# Altium PCB ESP32 PCB V1.PcbDoc (part 3 of 3)
Units mil, origin at the board's own origin, x right, y up, seen from the top; angles counter-clockwise.
Board outline 2800 x 1000 mil, 4 copper layers (L1, L2, L3, L4), stack 61.583 mil thick; 64 components, 73 nets, 299 pads, 159 vias.
Unrouted connection lines stored in the file: 3.
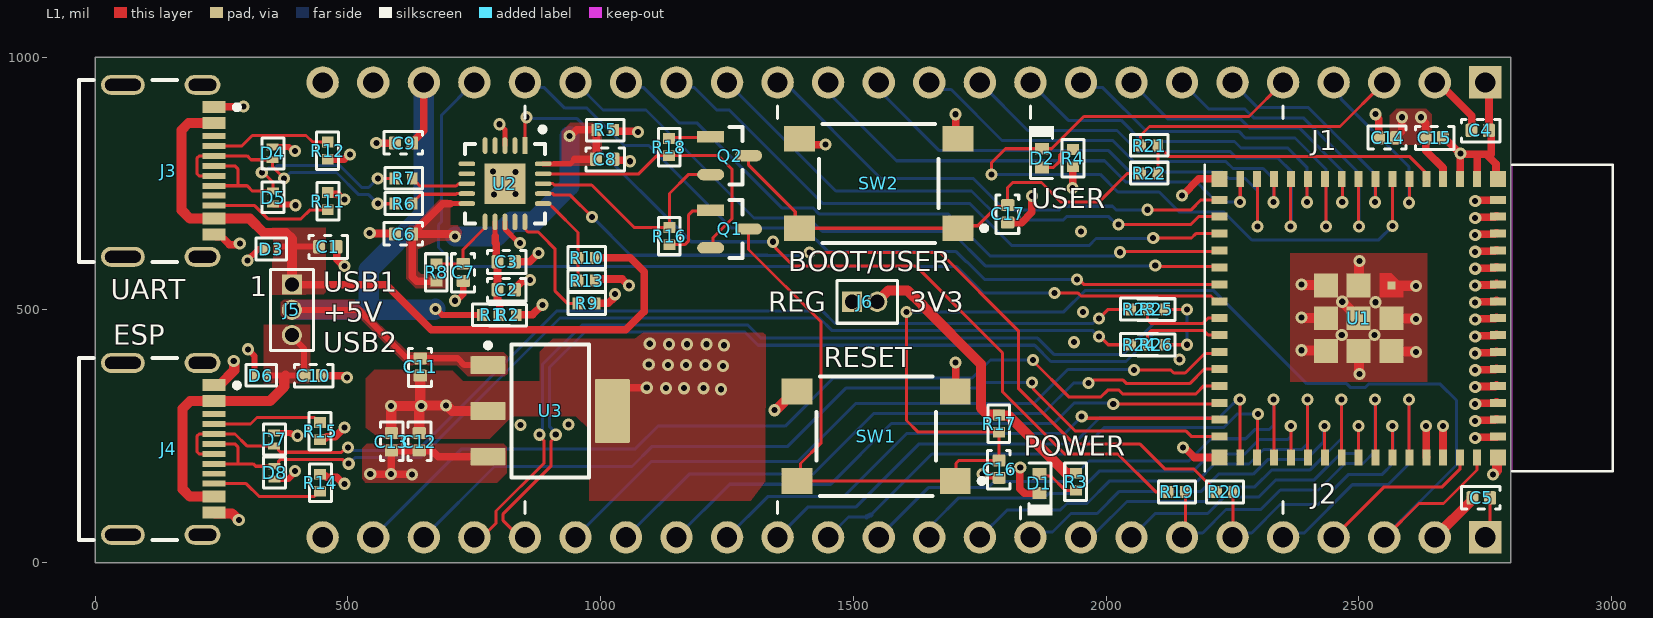
[diagram p0: L1 view]

## Via types
v1: diameter 24, hole 12, L1 to L4, tented both sides, 159 vias

## Nets (pads, with @x,y where several pads share a name; then routed paths per layer and width w, separated by ;. In a path a pad name is that pad's centre, name@x,y a point inside that pad or via, vN(x,y) a via of type N, cw(c..) or ccw(c..) an arc to the next point about the centre after c; other vN are vias at no path point) (continued)
GND: (continued)
  L1 w15: J3.B1A12 239.15,644.7 249.98,644.7 265.68,629 281.56,629 283.56,631 v1(286,631) ; J3.A1B12 249.47,900.98 249.98,901.49 292.49,901.49 v1(293,902) ; R14.1 448.13,171.87 455.34,171.87 458.1,169.11 477.4,169.11 490.63,155.88 v1(493.06,155.88) ; R15.1 448.13,246.12 455.34,246.12 458.1,248.88 474.88,248.88 v1(493,267) ; C10.1 491.56,370 495.56,366 v1(498,366) ; R11.1 463.13,728.88 479.71,728.88 490.59,718 v1(493,718) ; R12.1 492.56,797.99 501.56,807 v1(504,807) ; C1.1 477.58,624.62 477.58,600.29 490.87,587 v1(493,587) ; v1(543,652) 544,651 591.8,651 C6.1 ; v1(556,830) C9.1 ; C2.1 830.2,541.38 845.95,557.12 858.58,557.12 v1(860.3,558.84) ; C3.1 859.31,595 v1(877.16,612.84) ; R9.1 1015.06,513 1026.28,524.22 1026.28,529.28 v1(1028,531) ; R13.1@989.54,558.53 992.04,561.03 1042.47,561.03 1055.5,548 v1(1056.29,548) ; U3.4 1023.03,319.05 1049.98,346 v1(1091,346) ; C8.1 1027.28,795.72 1056.09,795.72 v1(1057.82,794) ; SW2.4 1405.09,827 v1(1445,827) ; SW1.3 1702,339.09 v1(1702,396) ; v1@1702,877 1702,843.08 SW2.3 ; v1(1755,175.2) 1757.44,175.2 1760.53,172.11 1783.69,172.11 C16.1 ; C17.1 1832.8,672.8 1853,693 v1(1853,725) ; v1(1830,188) 1829,187 1829,145.79 1837.79,137 D1.1@1864.4,137 ; v1(2150,726) 2183.06,759.06 U1.63 ; v1(2151.84,228) 2154.28,228 2174.34,207.94 U1.64 U1.64 ; v1(2533.09,887.09) 2533.09,884.66 2539.3,878.45 C14.1 ; v1@2632.49,264.56 2632.89,264.16 2632.89,209.06 U1.42@2633.64,208.31 ; C15.1@2665.91,838.93 C15.1 ; C15.1@2665.91,843.93 2700.84,809 v1(2701,809) ; v1@2665.96,264.56 2666.36,264.16 2666.36,209.06 U1.43@2667.11,208.31 ; U1.2 2700.57,759.43 2700.57,808.57 v1(2701,809) ; v1(2730,246.75) 2731.23,247.98 2773.77,247.98 U1.46 ; v1(2730,280.21) 2731.23,281.44 2769.16,281.44 U1.47@2772.13,284.41 ; v1(2730,313.68) 2731.23,314.91 2769.16,314.91 U1.48@2772.13,317.87 ; v1(2730,347.14) 2731.23,348.37 2769.16,348.37 U1.49@2772.13,351.34 ; v1(2730,380.61) 2731.23,381.84 2769.16,381.84 U1.50@2772.13,384.8 ; v1(2730,414.07) 2731.23,415.3 2769.16,415.3 U1.51@2772.13,418.27 ; v1(2730,447.54) 2731.23,448.77 2769.16,448.77 U1.52@2772.13,451.73 ; v1(2730,481) 2731.23,482.23 2769.16,482.23 U1.53@2772.13,485.2 ; v1(2730,514.46) 2731.23,515.7 2769.16,515.7 U1.54@2772.13,518.66 ; v1(2730,547.93) 2731.23,549.16 2769.16,549.16 U1.55@2772.13,552.13 ; v1(2730,581.39) 2731.23,582.63 2769.16,582.63 U1.56@2772.13,585.59 ; v1(2730,614.86) 2731.23,616.09 2769.16,616.09 U1.57@2772.13,619.06 ; v1(2730,648.32) 2731.23,649.56 2769.16,649.56 U1.58@2772.13,652.52 ; v1(2730,681.79) 2731.23,683.02 2769.16,683.02 U1.59@2772.13,685.98 ; v1(2730,715.25) 2731.23,716.48 U1.60@2769.16,716.48 ; U1.1@2733.76,759.15 2733.76,807.6 ; J1.1 2757.2,942.8 C4.1 2761.52,850.69 2761.52,807.55 2761.47,807.6 2752.07,807.6 ; U1.62@2775.1,759.15 2771.15,763.1 2771.15,788.52 2752.07,807.6 ; v1(2701,809) 2702.4,807.6 2733.76,807.6 ; 2733.76,807.6 2752.07,807.6
  L1 w20: J4.B1A12 236.65,97.2 270.8,97.2 v1(284,84) ; J4.A1B12 245.67,350.98 275,380.32 v1@275,390 ; C13.1 585.5,256.7 585.5,309.5 v1(585,310) v1(645,310) ; C12.1 641,304.92 645,308.92 v1(645,310) ; C11.1 643,313.08 645,311.08 v1(645,310) ; U3.2 706.08,300 695.08,311 v1(694,311) 693.5,310.5 645.5,310.5 v1(645,310) ; v1(1343.54,301.46) 1344.3,302.23 1347.23,302.23 1383.58,338.58 SW1.4 ; v1(2386,550) 2386.77,549.23 2433.64,549.23 U1.71 U1.71@2434.87,548 ; v1@2386.77,419.31 U1.73@2433.64,419.31 ; v1@2386.77,484.27 2433.64,484.27 U1.72 ; v1(2467,516) 2467,515.87 U1.61 ; U1.70@2498.6,417.69 2500.22,416.08 2500.22,373.91 v1(2500.98,373.14) ; U1.69@2500.22,549.23 v1@2500.22,596.11 ; U1.68@2565.18,417.69 v1@2612.05,417.69 ; U1.67@2565.18,482.66 v1@2612.05,482.66 ; U1.66@2565.18,547.62 v1@2612.05,547.62 ; J2.2 2722.98,122.98 2722.98,128.19 C5.1@2724.8,130 ; v1(2765,174) 2773,182 2773,205.87 U1.65
  other v1: 395,181 400,251 2632.49,270 2665.96,270 841,272 936,273 1238,343 1129,345 1165,345 1203,345 1242,389 1133,391 1169,391 1207,391 1095,392 274,399 2145,402 2612.82,416.93 2386,420.08 1244,430 1135,432 1171,432 1209,432 1097,433 1936,436 2466,450 2531,450 2612.82,481.89 2386,485.04 1954,496 2533,515 2612.82,546.85 2500.98,596.87 1950,655 789,728 831,729 831,773 787,774 1702,887
GPIO0: R21.2 R22.2 U1.4 | length 620.9
  L1 w6: R22.2 R21.2 2102.01,823.82 2107.64,818.19 2109.31,818.19 2124.49,803.01 2600.69,803.01 2630.39,773.3 2630.39,761.93 U1.4
GPIO1: J1.4 U1.5 | length 344
  L1 w6: v1@2599.8,714.8 U1.5
  L4 w6: J1.4 2450,935.39 2464.23,921.15 2464.23,917.77 2599,783 v1(2599,712)
GPIO2: D2.1 J1.5 U1.6 | length 1624.3
  L1 w6: v1@1773,761.6 v1(1773,768) 1773,791 1800.7,818.7 D2.1 1891.97,818.7 1955.86,882.59 2282.59,882.59 J1.5 ; v1(2566.34,665.59) U1.6
  L4 w6: v1(1773,768) 1988,768 2023,733 2104.82,733 2144.38,693.44 2232.59,693.44 2288.03,638 2511.18,638 2511.76,638.57 2539.32,638.57 v1(2566.34,665.59)
GPIO3: J1.6 U1.7 | length 458.8
  L1 w6: v1(2532,713) 2532.44,713.44 2532.44,758.62 U1.7
  L4 w6: J1.6 2300,900 2400,900 2532,768 v1(2532,713)
GPIO4: J1.7 U1.8 | length 623.9
  L1 w6: U1.8 2499.41,665.59 v1(2500,665)
  L4 w6: J1.7 2202.64,897.36 2274.36,897.36 2291.72,880 2390,880 2500,770 v1(2500,665)
GPIO5: J1.8 U1.9 | length 596.5
  L1 w6: v1@2467.44,713.44 U1.9@2467.44,758.62
  L4 w6: J1.8 2122.64,877.36 2266.07,877.36 2283.43,860 2381.72,860 2467,774.72 v1(2467,713)
GPIO6: J1.9 U1.10 | length 763
  L1 w6: v1@2434.41,665.59 U1.10@2434.41,759.06
  L4 w6: J1.9 1960.33,939.67 1993.33,939.67 2079.87,853.13 2262.02,853.13 2275.15,840 2373.43,840 2435,778.43 v1(2435,665)
GPIO7: J1.10 U1.11 | length 730.9
  L1 w6: v1@2397.44,713.44 U1.11@2397.44,758.62
  L4 w6: J1.10 1925,875 2029.72,875 2071.59,833.13 2253.74,833.13 2266.86,820 2359.29,820 2397,782.29 v1(2397,713)
GPIO8: J1.11 U1.12 | length 892.6
  L1 w6: v1(2365,665) U1.12@2365,758.5
  L4 w6: J1.11 1845,855 2021.43,855 2063.31,813.13 2245.45,813.13 2258.58,800 2340,800 2366.93,773.07 2366.93,666.93 v1(2365,665)
GPIO9: J1.12 U1.13 | length 851.4
  L1 w6: v1@2331.65,713.44 U1.13@2331.65,758.62
  L4 w6: J1.12 1664.61,950 1678.85,935.77 1693.23,935.77 1794,835 2013.15,835 2055.02,793.13 2237.17,793.13 2250.8,779.49 2310.51,779.49 2331.21,758.79 v1(2331.21,713)
GPIO10: J1.13 U1.14 | length 1011
  L1 w6: v1(2299.21,665) U1.14@2299.21,758.46
  L4 w6: J1.13 1550,935.39 1565.73,919.65 1565.73,919.27 1670,815 2004.86,815 2046.74,773.13 2228.88,773.13 2242.52,759.49 2275.51,759.49 2299.21,735.79 v1(2299.21,665)
GPIO11: J1.14 U1.15 | length 969.7
  L1 w6: v1@2265.16,713.87 U1.15
  L4 w6: J1.14 1460.33,939.67 1460.33,919.67 1585,795 1996.58,795 2038.58,753 2179,753 2190,742 2190,741.82 2218.38,713.44 v1(2264.72,713.44)
GPIO12: J1.15 U1.16 | length 992.2
  L1 w6: v1(2082,698) 2168,698 2187.72,717.72 U1.16
  L4 w6: J1.15 1364,950 1554,760 1737,760 1799,698 1907.09,698 1914.09,705 2012.5,705 2019.5,698 v1(2082,698)
GPIO13: J1.16 U1.17 | length 1102.3
  L1 w6: v1(2024,669) 2167.28,669 2182.54,684.25 U1.17
  L4 w6: J1.16 1465,735 1733.72,735 1790.72,678 1915.37,678 1922.37,685 2004.21,685 2020.21,669 v1(2024,669)
GPIO14: J1.17 U1.18 | length 1217.5
  L1 w6: v1(2093,642) 2168.57,642 2177.36,650.79 U1.18
  L4 w6: J1.17 1160.33,939.67 1185.33,939.67 1230,895 1254.86,895 1439.86,710 1730.43,710 1813.43,627 1966,627 1980,641 2092,641 v1(2093,642)
GPIO15: J1.18 U1.19 | length 1320.2
  L1 w6: v1(2027,614) 2028,615 2221.5,615 U1.19
  L4 w6: J1.18 1060.33,939.67 1085.33,939.67 1155,870 1190,870 1358.24,701.76 1419.82,701.76 1431.58,690 1687,690 1770,607 2016.21,607 2023.21,614 v1(2027,614)
GPIO16: J1.19 U1.20 | length 1426.3
  L1 w6: v1(2097,588) 2099.07,585.93 2221.75,585.93 U1.20
  L4 w6: J1.19 1004.53,895.47 1089.53,895.47 1303.24,681.76 1411.54,681.76 1438.29,655 1693,655 1761,587 2096,587 v1(2097,588)
GPIO17: J1.20 U1.21 | length 1539.3
  L1 w6: v1(1942,560) 1945.79,560 1955.39,550.39 U1.21
  L4 w6: J1.20 860.33,939.67 888.33,939.67 929,899 972.72,899 1046.72,825 1095,825 1258.24,661.76 1403.25,661.76 1450.01,615 1703.28,615 1723.28,595 1724.72,595 1759.72,560 v1(1942,560)
GPIO18: J1.21 U1.22 | length 1946
  L1 w6: v1(1898,533) 1944.5,533 1949.98,527.52 2207.21,527.52 2213.07,521.66 2213.07,519.8 2215.94,516.93 U1.22
  L4 w6: J1.21 685,885 685,674.11 679,668.11 679,623.36 716.52,585.84 1704.16,585.84 1757,533 v1(1898,533)
GPIO21: J2.19 U1.25 | length 1431.4
  L1 w6: v1(2055,381) 2127.82,381 2133.82,375 2156.18,375 2194.85,413.66 2220.94,413.66 U1.25
  L4 w6: J2.19 1100,200 1390,200 1505,315 1857.13,315 1924.12,381.99 2054.01,381.99 v1(2055,381)
GPIO26: J2.18 U1.26 | length 1317.6
  L1 w6: v1(1965,354.99) 1968.79,354.99 1974.79,361 2033.47,361 2040.47,354 2165,354 2194.07,383.07 U1.26
  L4 w6: J2.18 1175,175 1420,175 1540,295 1875.1,295 1935.09,354.99 v1(1965,354.99)
GPIO33: J2.17 U1.28 | length 1185.8
  L1 w6: v1(2014,314) 2221.68,314 U1.28
  L4 w6: J2.17 1255,155 1455,155 1575,275 1896,275 1937.14,316.14 2011.86,316.14 v1(2014,314)
GPIO34: J2.16 U1.29 | length 1075.6
  L1 w6: v1(1951.49,289.14) 1955.28,289.14 1958.87,285.55 2220.94,285.55 U1.29
  L4 w6: J2.16 1330.36,130.36 1480.36,130.36 1605,255 1917.35,255 v1(1951.49,289.14)
GPIO35: J2.15 U1.31 | length 1142.9
  L1 w6: v1(2264.28,323) 2264.72,322.56 2264.72,208.31 U1.31
  L4 w6: J2.15 1410.36,110.36 1505.36,110.36 1630,235 1935.53,235 1987.53,287 2223.72,287 2250.72,314 2251.5,314 2260.5,323 v1(2264.28,323)
GPIO36: J2.14 U1.32 | length 1037
  L1 w6: U1.32 2299.31,208.56 2299.31,293.31 v1(2300,294)
  L4 w6: J2.14 1490.36,90.36 1525.92,90.36 ; 1534.3,94.3 1655,215 1943.82,215 1995.82,267 2232,267 2259,294 v1(2300,294)
  L4 w10: 1525.92,90.36 cw(c1550,50) 1534.3,94.3
GPIO37: J2.13 U1.33 | length 1039.7
  L1 w6: v1(2331.21,323) 2331.65,322.56 2331.65,208.31 U1.33
  L4 w6: J2.13 1648.2,148.2 1766.18,148.2 1777.98,160 1925,160 1966,201 2163.29,201 2207.29,245 2276.01,245 2294.65,263.64 2323,263.64 2331.21,271.85 v1(2331.21,323)
GPIO38: J2.12 U1.34 | length 887.3
  L1 w6: v1@2365.21,265 2365.38,264.83 2365.38,208.04 U1.34
  L4 w6: J2.12 1660.33,60.33 1660.33,80.33 1708.2,128.2 1877.59,128.2 1886.39,137 1942,137 1986,181 2171.58,181 2205.58,215 2274.29,215 2302.94,243.64 2359.35,243.64 2365.21,249.5 v1(2365.21,270)
GPIO39: J2.11 U1.35 | length 928.6
  L1 w6: v1(2398.14,323) 2398.58,322.56 2398.58,208.31 U1.35
  L4 w6: J2.11 1804,104 1909.25,104 1922.25,117 1962,117 2006,161 2179.86,161 2213.86,195 2282.58,195 2311.22,223.64 2386.94,223.64 2398.43,235.13 2398.43,322.72 v1(2398.14,323)
GPIO40: J2.10 U1.36 | length 742.8
  L1 w6: v1@2432.14,265 2432.31,264.83 2432.31,208.04 U1.36
  L4 w6: J2.10 1860.33,60.33 1893.86,60.33 1930.53,97 1982,97 2026,141 2188.15,141 2222.15,175 2290.86,175 2319.51,203.64 2395.22,203.64 2429.58,238 2429.58,262.44 v1@2432.14,265
  other v1: 2432.14,270
GPIO41: J2.9 U1.37 | length 789.4
  L1 w6: v1(2465.07,323) 2465.51,322.56 2465.51,208.31 U1.37
  L4 w6: J2.9 1960.33,60.33 1980.33,60.33 2041,121 2196.43,121 2225.43,150 2294.15,150 2327.79,183.64 2403.51,183.64 2465.35,245.49 2465.35,322.72 v1(2465.07,323)
GPIO42: J2.8 U1.38 | length 620.6
  L1 w6: v1@2499.07,265 2499.24,264.83 2499.24,208.04 U1.38
  L4 w6: J2.8 2097,97 2200.72,97 2233.72,130 2302.43,130 2336.07,163.64 2411.79,163.64 2464.15,216 2493.1,216 2499.07,221.97 v1@2499.07,265
  other v1: 2499.07,270
GPIO45: J2.5 U1.41 | length 552.4
  L1 w6: v1(2598.93,323) 2599.37,322.56 2599.37,208.31 U1.41
  L4 w6: J2.5 2358.23,58.23 2391.23,58.23 2487,154 2557.42,154 2599.21,195.79 2599.21,322.72 v1(2598.93,323)
GPIO46: J2.4 U1.44 | length 328.9
  L1 w6: J2.4 2550,150 2665,150 2699.64,184.64 2699.64,207.32 U1.44
GPIO47: J2.23 U1.27 | length 1865.5
  L1 w6: v1(1855,401) 1855,398.81 1925.81,328 1953.81,328 1989.81,327.99 2002.82,341 2025.18,341 2032.18,334 2177.57,334 2193.17,349.61 U1.27
  L4 w6: J2.23 725,225 1068.43,225 1113.43,270 1365,270 1460,365 1734.93,365 1770.93,401 v1(1855,401)
GPIO48: J2.22 U1.30 | length 1750.7
  L1 w6: v1(1853.09,356.09) 1855.77,353.41 1855.77,343.51 1939.28,260 2158.29,260 2169.08,249.21 U1.30
  L4 w6: J2.22 790,190 1061.72,190 1101.72,230 1370,230 1485,345 1743.21,345 1754.3,356.09 v1(1853.09,356.09)
NetD1_2: D1.2 R3.1 | length 88
  L1 w6: D1.2@1868.53,174.87 1872.1,171.3 1890.7,171.3 1919.02,142.98 R3.1@1943.34,142.98
NetD2_2: D2.2 R4.1 | length 84.7
  L1 w6: D2.2 1873.62,781.92 1895.92,781.92 1907.19,793.19 1907.19,804.83 1914.86,812.5 1934.42,812.5 R4.1@1936.92,815
Netj3_A5: J3.A5 R12.2 | length 239.2
  L1 w6: J3.A5 290.03,824.21 298,832.18 310.91,845.09 417.09,845.09 430.18,832.01 R12.2
Netj3_B5: J3.B5 R11.2 | length 243.4
  L1 w6: J3.B5 298,706.1 315.39,706.1 341.5,680 407.18,680 425.18,697.99 R11.2
Netj4_A5: J4.A5 R15.2 | length 219.6
  L1 w6: J4.A5 307.21,274.21 320,287 433.83,287 443.82,277.01 R15.2
Netj4_B5: J4.B5 R14.2 | length 224.7
  L1 w6: J4.B5 298.69,156.1 323.79,131 433.83,131 443.82,140.98 R14.2
NetQ1_1: Q1.1 R16.1 | length 139.8
  L1 w6: R16.1 1165.99,628.99 1174,637 1174,688 1182,696 1216.18,696 Q1.1
NetQ2_1: Q2.1 R18.1 | length 84
  L1 w6: R18.1 1136.7,840.7 1215.88,840.7 Q2.1
NetR9_2: R9.2 U2.15 | length 228.9
  L1 w6: U2.15 850,659.86 855.86,654 876.18,654 884.18,646 910,620.18 910,537 934,513 R9.2
RTS_FTDI: Q1.2 R18.2 U2.19 | length 571.9
  L1 w6: U2.19@886.37,768.95 908,768.95 1054.74,768.95 ; 1054.83,768.95 1075.27,769.27 1110.99,804.99 R18.2 1232.78,804.99 1259.29,778.48 1259.29,679.93 1222.37,643 1222.37,627.39 Q1.2
RXD_FTDI: R19.2 U2.1 | length 1694.6
  L1 w6: U2.1 850,850 850,874.21 853,877.21 v1(853,881) ; v1(1341.02,634.76) 1341.02,630.97 1346,625.99 1346,622 1381,587 1402.64,587 1402.82,586.83 1425.18,586.83 1425.36,587 1623,587 1795,415 1795,337.71 1917.71,215 2023,215 2098,140 R19.2
  L4 w6: v1(853,881) 855,879 952.5,879 973,858.5 973,840.63 1178.88,634.76 v1(1341.02,634.76)
TXD_FTDI: R20.2 U2.17 | length 1648.7
  L1 w6: U2.17 905.1,729.9 908,727 939.9,727 v1@982.9,684 ; v1(1413,613.83) 1671.17,613.83 1826.09,458.91 1826.09,344.91 1936,235 2066.24,235 2115.81,185.44 2172.56,185.44 2211.18,146.81 2212.36,146.81 2217.99,141.18 R20.2
  L4 w6: v1(983,684) 1059,608 1329.59,608 1329.83,607.76 1402.06,607.76 1408.13,613.83 v1(1413,613.83)
UORXD: J2.6 R20.1 U1.40 | length 595.3
  L1 w6: J2.6 2251,51 2251,139 R20.1 ; v1@2566,265 2566.17,264.83 2566.17,208.04 U1.40
  L4 w6: J2.6 2258.73,58.73 2287.73,58.73 2344,115 2419.72,115 2478.72,174 2545.21,174 2567.21,196 2567.21,263.79 v1@2566,265
  other v1: 2566,270
UOTXD: J2.7 R19.1 U1.39 | length 763.7
  L1 w6: J2.7 2157.01,57.01 R19.1 ; v1(2532,323) 2532.44,322.56 2532.44,208.31 U1.39
  L4 w6: J2.7 2158.73,58.73 2190.73,58.73 2237,105 2305.72,105 2344.36,143.64 2420.07,143.64 2472.43,196 2507.86,196 2532,220.14 v1(2532,323)
VBUS_SENSE: R10.1 R13.2 U2.16 | length 187.7
  L1 w6: U2.16 897.78,710.22 908,700 954.99,653.01 R10.1 R13.2
pads on no net: J1.24 J3.A8 J3.B8 J4.A8 J4.B8 U2.2 U2.4 U2.5 U2.6 U2.7 U2.14

## Polygon pours and split planes (outlines as drawn)
+3V3_FTDI on L1 "+3V3_FTDI_L01_P004" (solid, pour order 4): 716.82,667.82 703,667.82 701.91,668.91 702.19,714.63 695.37,720.12 683,720.12 630,666 620,666 615,662.11 615,562 634,543 694,543 694,566 690,570 645,570 638,577 638,619.56 677.25,637 718,637 722,640 726,655
GND on L1 "GND_L01_P013" (solid, pour order 13): 1083,455 1326,455 1325,160 1297,122 977,122 977,264 951,290 825,290 775,240 570.59,240 535,267 535,365 552,382 705,382 728,359 879,359 879,417 905,443 1067,443
GND on L1 "GND_L01_P011" (solid, pour order 11): 2364,612 2635,612 2635,358 2364,358
+5V on L1 "+5V_L01_P007" (solid, pour order 7): 374.67,521 413.45,520.3 512.79,520.3 618.95,416 808,416 816,408 816,373.5 810.6,369 737.05,369 715.05,390 616,390 525,481 375,481 367,489 367,516.07
+5V_VBUS2 on L1 "+5V_VBUS2_L01_P010" (solid, pour order 10): 425,471 425,355 333,355 333,471
+5V_VBUS1 on L1 "+5V_VBUS1_L01_P008" (solid, pour order 8): 455.78,662.29 456.2,530 349.79,530 349.79,662.29
+3V3_REG on L1 "+3V3_REG_L01_P006" (solid, pour order 6): 814,229 814,177 795,158 534.4,158 528,166 528,226 537,235 808,235
+3V3_FTDI on L1 "+3V3_FTDI_L01_P003" (solid, pour order 3): 1002,785 928.07,785 923,790.07 923,853 940,870 1002,870
+3V3 on L1 "+3V3_L01_P000" (solid, pour order 0): 2560.82,885.1 2574.05,898 2633,898 2644.02,886.98 2643.98,828.98 2642,827 2563,827 2561.21,828.79
GND on L2 "GND_L02_P018" (solid, remove dead copper, pour order 18): 2785,10 2785,980 10,980 10,10
+3V3 on L2 "+3V3_L02_P015" (solid, pour order 15): 1980,745 2685,745 2685,230 2485,230 2485,0 2780,0 2780,980 1005,980 995,970 995,710 1485,710 1500,695 1500,490 1585,490 1585,705 1750,705 1805,760 1865.58,760 1865.58,710 1880.58,695 1962.21,694.01 1980,705
+3V3_REG on L2 "+3V3_REG_L02_P017" (solid, pour order 17): 525,150 745,150 745,210 525,210
GND on L3 (split plane): 2799.95,0.05 0.05,0.05 0.05,999.95 2799.95,999.95

## Silkscreen, mask and mechanical layers (free items; w line width, h text height)
Top Overlay:
  lines w6: 850,97 850,121 ; 850,879 850,903 ; 1350,97 1350,121 ; 1350,879 1350,903 ; 1830,86 1830,110 ; 1850,879 1850,903 ; 2350,97 2350,121 ; 2350,879 2350,903
  text "J1" at 2406,816 h40
  text "USER" at 1851.69,701 h40
  text "BOOT/USER" at 1371,576 h40
  text "USB1" at 451,536 h40
  text "UART" at 31,521 h40
  text "REG" at 1331,496 h40
  text "3V3" at 1611,496 h40
  text "+5V" at 451,476 h40
  text "ESP" at 36,431 h40
  text "USB2" at 451,416 h40
  text "RESET" at 1441,386 h40
  text "POWER" at 1836.7,211 h40
  text "J2" at 2406,116 h40
Bottom Overlay:
  text "NC" at 473,876 h40 r90
  text "GND" at 573,876 h40 r90
  text "5V" at 673,876 h40 r90
  text "IO18" at 773,876 h40 r90
  text "IO17" at 873,876 h40 r90
  text "IO16" at 973,876 h40 r90
  text "IO15" at 1073,876 h40 r90
  text "IO14" at 1173,876 h40 r90
  text "IO13" at 1273,876 h40 r90
  text "IO12" at 1373,876 h40 r90
  text "IO11" at 1473,876 h40 r90
  text "IO10" at 1573,876 h40 r90
  text "IO9" at 1673,876 h40 r90
  text "IO8" at 1773,876 h40 r90
  text "IO7" at 1873,876 h40 r90
  text "IO6" at 1973,876 h40 r90
  text "IO5" at 2073,876 h40 r90
  text "IO4" at 2173,876 h40 r90
  text "IO3" at 2273,876 h40 r90
  text "IO2" at 2373,876 h40 r90
  text "IO1" at 2473,876 h40 r90
  text "IO0" at 2573,876 h40 r90
  text "3V3" at 2673,876 h40 r90
  text "GND" at 2773,876 h40 r90
  text "<---PIN1--->" at 2773,743 h40 r90
  text "(C)2026 ALJURI ALDOSARI" at 1995,634 h40
  text "GND" at 470,265 h40 r90
  text "I047" at 570,265 h40 r90
  text "I048" at 670,265 h40 r90
  text "USB-" at 770,265 h40 r90
  text "USB+" at 870,265 h40 r90
  text "I021" at 970,265 h40 r90
  text "I026" at 1070,265 h40 r90
  text "I033" at 1170,265 h40 r90
  text "I034" at 1270,265 h40 r90
  text "I035" at 1370,265 h40 r90
  text "I036" at 1470,265 h40 r90
  text "I037" at 1570,265 h40 r90
  text "I038" at 1670,265 h40 r90
  text "I039" at 1770,265 h40 r90
  text "I040" at 1870,265 h40 r90
  text "I041" at 1970,265 h40 r90
  text "I042" at 2070,265 h40 r90
  text "TXD" at 2170,265 h40 r90
  text "RXD" at 2270,265 h40 r90
  text "I045" at 2370,265 h40 r90
  text "I046" at 2470,265 h40 r90
  text "EN" at 2570,265 h40 r90
  text "GND" at 2670,265 h40 r90
  text "3V3" at 2773,265 h40 r90
Board Shape:
  the board outline again, w20

## Text inside footprints (layer, text, board x,y; h text height)
J1: Bottom Overlay "1" at 2734,1045 h40 r270
J2: Bottom Overlay "1" at 2726,-54 h40 r270
J5: Top Overlay "1" at 306,527 h40